# Altium PCB Flight_Computer_2_GE.PcbDoc (part 5 of 5)
Units mil, origin at the board's own origin, x right, y up, seen from the top; angles counter-clockwise.
Board outline 4000 x 3000 mil, 4 copper layers (Top Layer, GND, 3.3V, Bottom Layer), stack 62.449 mil thick; 220 components, 150 nets, 776 pads, 444 vias.
Unrouted connection lines stored in the file: 107.
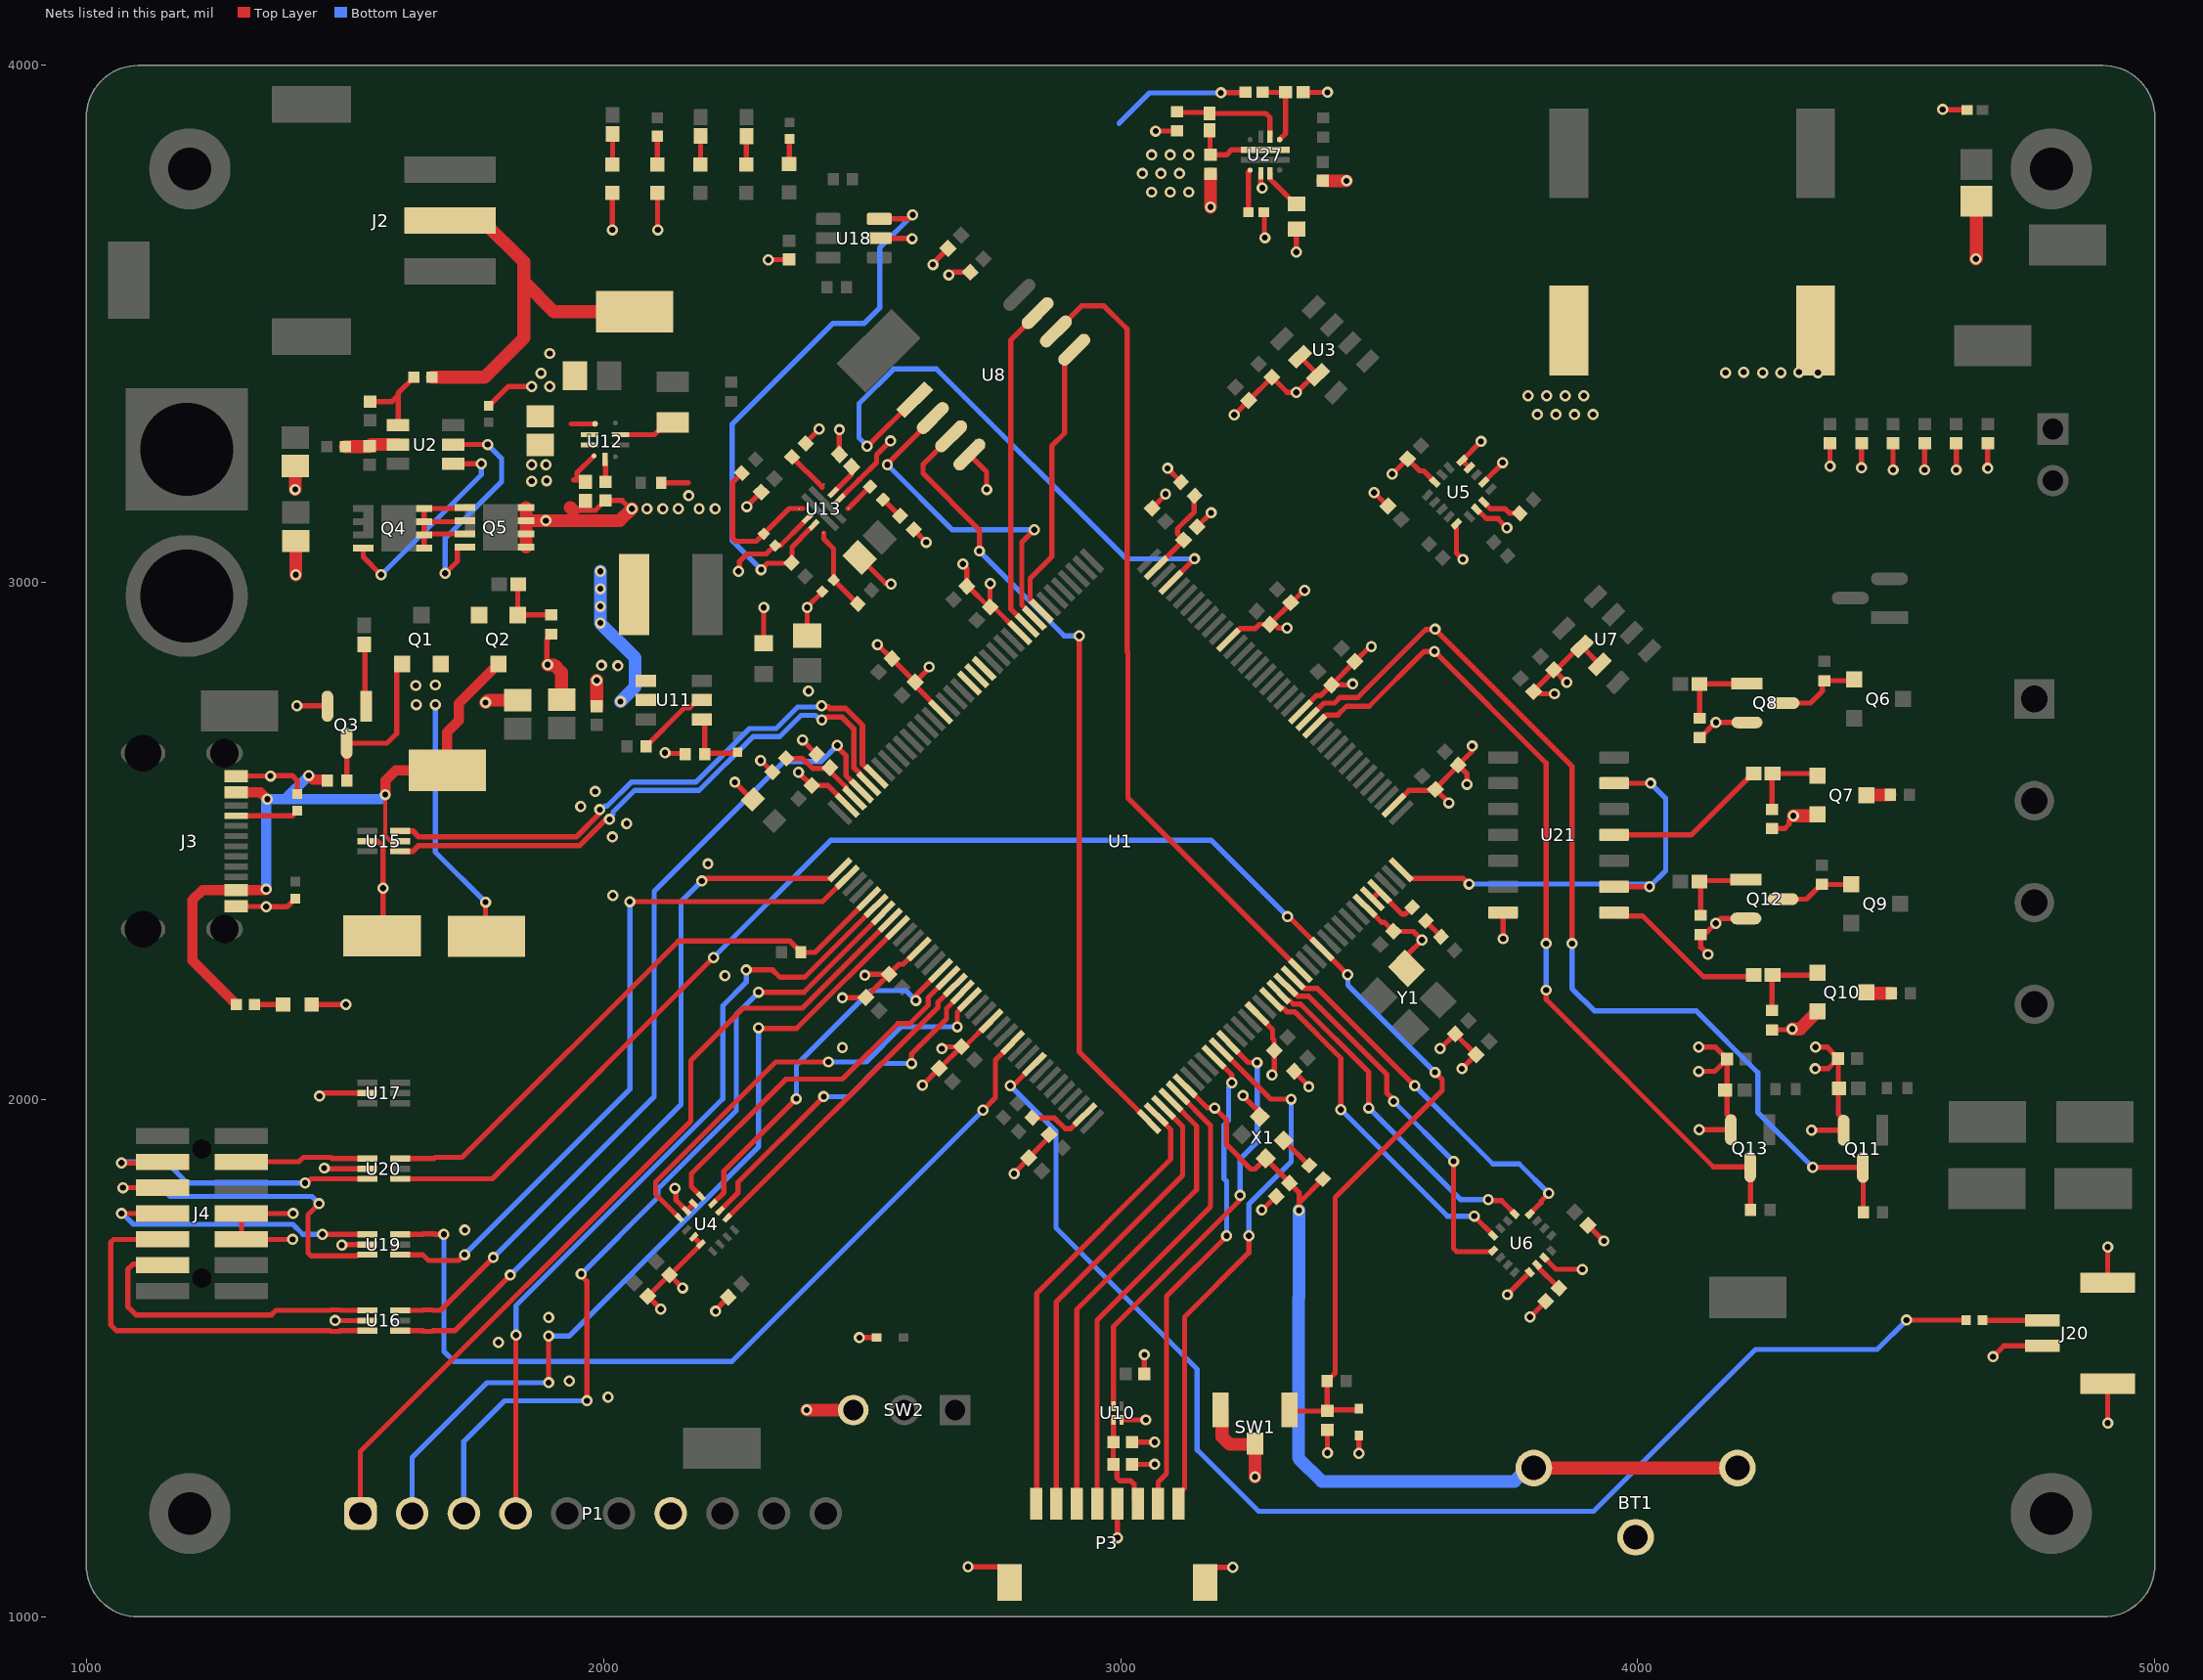
[diagram p5: the nets of this part, all layers, seen from the top]

## Via types
v1: diameter 21.65, hole 11.81, Top Layer to Bottom Layer, 444 vias

## Nets (pads, with @x,y where several pads share a name; then routed paths per layer and width w, separated by ;. In a path a pad name is that pad's centre, name@x,y a point inside that pad or via, vN(x,y) a via of type N, cw(c..) or ccw(c..) an arc to the next point about the centre after c; other vN are vias at no path point) (continued)
GND: BT1.2 C1.1 C2.1 C3.1 C4.1 C5.1 C6.1 C7.1 C8.1 C9.1 C10.1 C11.1 C12.1 C13.1 C14.1 C15.1 C16.2 C17.2 C18.1 C19.1 C20.1 C21.2 C22.1 C23.2 C24.1 C25.1 C26.1 C27.1 C28.1 C31.2 C32.2 C33.1 C34.1 C35.1 C36.1 C37.1 C38.1 C39.2 C40.2 C41.2 C42.2 C43.2 C44.2 C45.2 C46.2 C47.2 C48.2 C49.2 C50.2 C51.2 C52.2 C53.2 C54.2 C55.2 C56.2 C57.2 C58.2 C59.2 C60.2 C61.2 C62.1 C63.1 C64.2 C65.1 C66.1 C67.2 C68.2 C71.2 C101.2 C102.2 C104.2 C105.2 D1.1 D2.1 D3.1 D7.2 D8.2 J3.A1B12 J3.B1A12 J4.5 J4.7 J14.1 J20.1 J20.3 J20.4 P1.7 P3.5 P3.MP1 P3.MP2 Q3.2 Q5.5 Q5.6 Q5.7 Q5.8 Q7.2 Q8.2 Q10.2 Q11.2 Q12.2 Q13.2 R12.2 R13.1 R14.1 R15.2 R16.1 R17.1 R18.1 R23.1 R26.2 R29.2 R30.2 R42.1 R43.1 R46.1 R51.1 R52.1 R54.1 R56.1 R57.1 R68.1 R73.2 R74.2 R75.1 R76.2 SW1.2 SW1.3 SW2.3 U1.16 U1.31 U1.38 U1.51 U1.61 U1.83 U1.94 U1.107 U1.120 U1.130 U3.2 U3.3 U4.2 U4.3 U4.6 U4.7 U5.5 U5.7 U5.10 U5.12 U5.13 U5.16 U6.9 U6.11 U7.2 U7.3 U8.4 U10.4 U11.1 U12.4 U13.2 U13.8 U15.2 U16.2 U17.2 U18.2 U19.2 U20.2 U21.7 U27.8 X1.2 Y1.2 | length 10557.7
  Top Layer w10: J3.B1A12@1289.84,2374.02 1290.35,2373.51 1347.49,2373.51 v1(1348,2373) 1388,2373 1399.4,2384.4 1399.7,2384.4 1404,2388.7 R30.2@1404,2389 ; J3.A1B12@1289.84,2625.98 v1(1356,2626) 1356.72,2626.72 1398.28,2626.72 1408,2617 R29.2@1408,2591.3 ; v1(1399,1730) J4.5@1300,1730 J4.7@1300,1780 v1(1400,1780) ; v1(1407,2762) 1465.2,2762 Q3.2@1466.2,2761 ; D1.1@1435.56,2184.15 1435.63,2184.08 1501.92,2184.08 v1(1502,2184) ; v1(1451,2007) 1454.15,2007 1460.15,2013 U17.2@1543.31,2013 ; v1(1460,1867.83) 1461.14,1866.68 U20.2@1543.31,1866.68 ; v1(1481,1573) U16.2@1543.31,1573 ; v1(1494,1719) 1495,1720 U19.2@1543.31,1720 ; U15.2@1543.31,2500 1544.21,2499.09 1564.06,2499.09 1574,2489.16 v1(1574,2409) 1574,2319 J14.1@1572,2317 ; R26.2@1778,3341.89 1778.14,3341.89 1815.25,3379 v1(1861,3379) ; v1(1892,2841) 1890.47,2842.53 1890.47,2888.61 1892.19,2890.33 1892.19,2894.47 1898.02,2900.3 R23.1@1899,2900.3 ; 1938,3307 U12.4@1983.81,3307 ; 1942,3139.47 1984.19,3139.47 2003.61,3158.89 2035.96,3158.89 2051.85,3143 v1(2055,3143) ; v1(2017,3682) 2017.28,3682.28 2017.28,3753.16 D2.1@2017.56,3753.44 ; D3.1@2104,3753.44 2104.5,3752.94 2104.5,3682.5 v1(2105,3682) ; v1(2111,1595) C3.1@2085.81,1620.19 2086.31,1620.19 2127.31,1661.19 C4.1@2127.81,1661.19 ; v1(2119,2671) 2120.5,2669.5 2153.8,2669.5 2155.3,2671 R15.2@2158.3,2668 ; 2121.53,3193 2164,3193 ; v1(2138,1829) 2140.23,1826.77 2140.23,1805.85 U4.3@2160.66,1785.42 U4.2@2174.58,1799.34 ; v1(2153,1636) C4.1@2127.81,1661.19 ; U4.6@2174.61,1734.61 U4.7@2188.53,1720.69 2188.42,1720.69 2128.92,1661.19 C4.1@2127.81,1661.19 ; v1(2217,1591) 2217,1594 C5.1@2241.39,1618.39 ; v1(2254,2614) 2287.12,2580.88 C41.2@2289.12,2580.88 ; v1(2261,3022) 2263.23,3024.23 2263.23,3041.23 2277.43,3055.43 2314.83,3055.43 2331.26,3071.86 R16.1@2332.14,3071.86 2342.34,3071.86 U13.2@2386.22,3115.75 ; v1(2277,3147) C17.2@2305.19,3175.19 ; v1(2304,2656) 2304.55,2656 R56.1@2326.78,2633.78 ; C23.2@2310,2882.53 v1(2310,2952) ; v1(2319,3624) 2319.44,3624.44 2358.56,3624.44 C31.2@2359,3624.89 ; v1(2377,2633) 2377.31,2633 2402.5,2607.81 C56.2@2402.81,2607.81 ; v1(2385,2696) 2385,2695.5 2412.19,2668.31 C62.1@2412.19,2667.81 ; R18.1@2391.22,3269.22 2391.22,3273.22 2394.22,3273.22 2417,3296 v1(2417,3297) ; C22.1@2394,2897.46 v1(2394,2952) 2394,2953 2422.86,2981.86 R14.1@2422.86,2982.86 ; C56.2@2403.08,2607.53 2434.47,2607.53 2442,2600 2442,2599.94 2471.4,2570.54 U1.107@2471.4,2569.26 ; R17.1@2456.34,3247.66 2455.64,3248.36 2455.64,3294.97 v1(2456.34,3295.66) ; U13.8@2457.36,3161.98 2494.83,3199.45 2495.45,3199.45 2528.17,3232.17 2528.17,3247.17 v1(2555,3274) ; v1(2462,2197) 2462.53,2197.53 2506.92,2197.53 C43.2@2507.19,2197.81 2551.92,2242.53 2507.51,2242.53 v1(2505.49,2240.51) ; v1(2495,1540) D8.2@2528.03,1540 ; C18.1@2495.51,3048.51 2544.8,2999.23 2553.77,2999.23 v1(2556,2997) ; v1(2530,2880) 2530.31,2880 2557.5,2852.81 C46.2@2557.81,2852.81 C57.2@2602.81,2807.81 ; U18.2@2533.41,3666 2533.91,3665.5 2596.5,3665.5 v1(2597,3665) ; C55.2@2552.19,2242.81 2571.43,2262.04 2579.81,2262.04 2609.31,2291.54 U1.120@2610.59,2291.54 ; R68.1@2600.22,3102.78 2600.22,3101.78 2600.72,3101.78 2624,3078.5 v1(2624,3078) ; v1(2617,2028) 2617,2028.11 2649.39,2060.5 C45.2@2649.39,2060.61 2649.69,2060.61 C54.2@2691.61,2102.53 ; v1(2630,2837) 2629.28,2836.28 2629.28,2834.28 C57.2@2602.81,2807.81 ; v1(2637,3615) 2637,3617 C12.1@2666.19,3646.19 ; U1.94@2652.35,2750.22 2652.35,2751.5 2602.81,2801.04 C57.2@2602.81,2807.81 ; v1(2654.23,2098.77) 2657.38,2098.77 2661.13,2102.53 C54.2@2691.61,2102.53 ; v1(2668,3595) 2671.15,3595 2676.63,3600.47 2708.92,3600.47 C11.1@2709.19,3600.19 ; v1(2695,3036) 2695,3034.98 2702.53,3027.45 2702.53,2993.08 C47.2@2702.81,2992.81 2705.31,2992.81 2745.31,2952.81 C58.2@2747.81,2952.81 ; v1(2705,1097) 2705.13,1096.87 2766.72,1096.87 2785.34,1078.25 P3.MP1@2785.34,1066.44 ; U8.4@2707.69,3247.62 2741,3214.31 v1(2741,3180) ; v1(2748,2998) 2747.53,2997.53 2747.53,2953.08 C58.2@2747.81,2952.81 ; U1.130@2749.78,2152.35 2748.5,2152.35 2698.96,2102.81 C54.2@2692.19,2102.81 2691.89,2102.81 C54.2@2691.61,2102.53 ; v1(2794,1857) 2794,1858.02 2822.19,1886.22 C44.2@2822.19,1887.81 2862.19,1927.81 C53.2@2862.19,1932.81 ; U1.83@2805.46,2903.33 2804.18,2903.33 2754.7,2952.81 C58.2@2747.81,2952.81 ; v1(2994,1153) P3.5@2994,1219 ; U10.4@3002,1381 v1(3049,1381) ; C15.1@3022.11,1295 v1(3066,1295) ; C14.1@3022.11,1338 v1(3066,1338) ; C16.2@3046.11,1470 v1(3046.11,1506.89) ; C59.2@3061.19,3143.81 3061.19,3144.5 3087,3170.31 v1(3087,3171) ; v1(3068,3873) 3068.3,3873.3 R74.2@3109,3873.3 ; v1(3091,3221) 3091,3220.5 3116.78,3194.72 R57.1@3116.78,3194.22 ; C63.1@3147.81,3107.81 v1(3175,3135) ; P3.MP2@3163.29,1066.44 3163.29,1077.38 3181.91,1096 v1(3217,1096) ; U1.61@3208.46,2889.41 3209.74,2889.41 3231.33,2911 3260.23,2911 3268.43,2919.19 3278.62,2919.19 3278.9,2918.92 3288.53,2918.92 C51.2@3288.81,2919.19 3297.91,2919.19 3305.25,2911.86 3321.86,2911.86 v1(3322,2912) ; v1(3220,3324.39) C1.1@3247.81,3352.19 C2.1@3292.81,3397.19 3322,3368 v1(3340,3368) 3341.02,3368 3375,3401.98 U3.3@3381.78,3401.98 U3.2@3346.98,3436.78 ; v1(3237,2008) 3237,2006.98 3269.36,1974.62 X1.2@3269.36,1967.29 ; U1.16@3264.14,2166.27 3264.14,2164.99 3294,2135.12 3294,2118.77 3296.92,2115.85 3296.92,2095.47 3297.47,2094.92 3297.47,2055.63 3293,2051.15 v1(3293,2048) ; U27.8@3271.14,3791.72 3271.14,3765.86 v1(3274,3763) ; v1(3273,1787) 3274,1787 3300.19,1813.19 C64.2@3301.19,1813.19 ; C105.2@3276.9,3716 3277.95,3714.95 3277.95,3668.05 v1(3279,3667) ; C51.2@3288.81,2920.19 3328.81,2960.19 C49.2@3328.81,2961.19 3330.5,2961.19 3354.31,2985 v1(3356,2985) ; C68.2@3336.19,2055.19 3336.19,2052.81 3337.39,2052.81 3364,2026.19 v1(3364,2025) ; v1(3340,3639) R73.2@3340,3683.77 ; U1.51@3347.65,2750.22 3379.27,2781.84 3387.45,2781.84 C60.2@3407.81,2802.19 C60.2@3408.08,2802.47 ; R75.1@3352.73,3948 v1(3400,3948) ; v1(3400,1317) C67.2@3400,1361.89 ; v1(3449,2804) 3447,2802 3429.79,2802 3429.31,2802.47 C60.2@3408.08,2802.47 ; v1(3461,1316) D7.2@3461,1351.02 ; U1.31@3472.93,2375.06 3504.99,2343 3510.61,2343 C50.2@3527.81,2325.81 ; v1(3485,2876) 3484.28,2875.28 3480.89,2875.28 C48.2@3452.81,2847.19 C60.2@3408.08,2802.47 ; v1(3490,3174) 3490.5,3174 3516.69,3147.81 C6.1@3517.19,3147.81 ; v1(3525,3210) 3525.5,3210 3554.69,3239.19 C7.1@3555.19,3239.19 ; C50.2@3528.08,2325.53 3566.47,2325.53 v1(3583,2309) 3552.82,2278.82 Y1.2@3552.82,2254.07 ; U1.38@3528.6,2569.26 3557.34,2598 3596.98,2598 3599.17,2600.19 C52.2@3608.81,2600.19 ; C7.1@3555.19,3240.19 C7.1@3555.19,3239.19 ; U5.16@3607.67,3194.49 3586.13,3216.03 3578.36,3216.03 C7.1@3555.19,3239.19 ; v1(3618,2099) 3618.5,2099 3646.69,2127.19 C65.1@3647.19,2127.19 C66.1@3687.19,2087.19 v1(3660,2060) ; v1(3635,2574) C52.2@3608.81,2600.19 ; U5.5@3649.43,3113.75 3645.95,3110.27 3645.95,3108.99 3649.43,3105.51 3649.43,3057.57 v1(3662,3045) ; v1(3670,2610) 3670,2630 C61.2@3652.81,2647.19 ; U5.12@3674.49,3222.33 U5.13@3660.57,3236.25 3660.57,3236.41 3697,3272.84 v1(3697,3273) ; v1(3680,2684) 3679.28,2683.28 3679.28,2673.67 C61.2@3652.81,2647.19 ; U5.7@3688.41,3141.59 3689.69,3141.59 3707.28,3124 3731,3124 3731,3122 v1(3747,3106) ; U5.10@3702.33,3194.49 3702.33,3194.91 3739,3231.58 v1(3739,3232) ; v1(3739.72,2311.28) U21.7@3739.72,2362 ; v1(3748,1623) U6.9@3791.62,1666.63 ; v1(3792,1580) C13.1@3822.19,1610.19 ; U6.11@3819.45,1694.47 3841.92,1672 v1(3893,1672) ; C9.1@3837.61,2831.39 3837.33,2831.11 C9.1@3837.33,2829.42 ; v1(3839,2785) 3813.19,2785 3808.72,2789.47 3799.08,2789.47 C8.1@3798.81,2789.19 3798.81,2790.89 C9.1@3837.33,2829.42 ; C9.1@3839.31,2831.39 3842.1,2831.39 3887.49,2876.78 U7.2@3891.98,2876.78 U7.3@3926.78,2841.98 ; v1(3863,2807) 3862.5,2807 3840.08,2829.42 C9.1@3837.33,2829.42 ; C10.1@3903.81,1757.19 3934,1727 v1(3935,1727) ; v1(4118,2055) 4149.17,2055 C40.2@4172.78,2078.61 ; v1(4118,2102) 4149.78,2102 4165.57,2086.2 4165.97,2086.2 4172.78,2079.39 C40.2@4172.78,2079 C40.2@4172.78,2078.61 ; v1(4119,1942) Q13.2@4180.2,1942 4180.2,1964.08 4172.78,1971.5 4172.78,2019 C40.2@4172.78,2078.61 ; R42.1@4120,2700.3 4120.98,2700.3 4149.56,2728.88 4150.68,2728.88 v1(4151.4,2729.6) Q8.2@4211.33,2729.6 ; v1(4136,2281) 4122,2295 R52.1@4122,2319.3 4127.83,2325.13 4135.13,2325.13 v1(4151,2341) 4160.5,2350.5 Q12.2@4209.33,2350.5 ; R51.1@4260,2135.3 4296.28,2135.3 4297.98,2137 v1(4299,2137) ; R43.1@4260,2524.3 4284.3,2524.3 4293,2533 4293,2539.98 4301,2547.98 v1(4301,2549) ; v1(4336,1941) Q11.2@4398.2,1941 4398.2,1961.56 4387.89,1971.86 C39.2@4387.89,2079.61 ; v1(4343.38,2060) 4343.57,2060.19 4368.47,2060.19 C39.2@4387.89,2079.61 ; v1(4344,2102) 4365.89,2102 4380.69,2087.2 4381.08,2087.2 4387.89,2080.39 C39.2@4387.89,2080 C39.2@4387.89,2079.61 ; v1(4372,3225) C36.1@4372,3269.89 ; v1(4433,3222) C37.1@4433,3269.89 ; v1(4494,3218) C38.1@4494,3269.89 ; v1(4555,3218) C34.1@4555,3269.89 ; v1(4590,3915) 4590.5,3914.5 4636.69,3914.5 R76.2@4637.19,3914 ; v1(4616,3218) C35.1@4616,3269.89 ; v1(4677,3221) C33.1@4677,3269.89 ; v1(4687,1503) 4708,1524 J20.1@4783,1524 ; v1(4908.98,1374.98) J20.3@4908.98,1451.17 ; J20.4@4908.98,1646.05 v1(4908.98,1714.98) ; C52.2@3608.81,2600.19 3608.81,2601.69 3652.81,2645.69 C61.2@3652.81,2647.19
  Top Layer w25: v1(1404,3180) C27.1@1404,3225.44 ; v1(1405,3015) C28.1@1405,3080.44 ; v1(1772,2768) 1776.56,2772.56 C19.1@1834,2772.56 ; Q5.5@1850.41,3068.61 Q5.6@1850.41,3094.2 Q5.7@1850.41,3119.8 ; Q5.8@1850.41,3145.39 Q5.7@1850.41,3119.8 ; v1(1888.61,3119.8) v1@1889.57,3119.8 ; v1(1892,2841) 1904.36,2841 1919,2826.36 C20.1@1919,2773.56 ; 1936.09,3145.39 1942,3139.47 ; C21.2@1987,2761.11 v1(1987,2811) ; v1(2055,3143) 2031.8,3119.8 v1@1889.57,3119.8 ; v1(2393,1400) SW2.3@2483.15,1400 ; v1(3174,3726) C71.2@3174,3790.89 ; SW1.2@3193.07,1400 3196.32,1396.75 3196.32,1348.33 3210.96,1333.68 3258.64,1333.68 SW1.3@3260,1335.04 v1(3260,1271) ; C104.2@3391,3776.89 v1(3436.89,3776.89) v1@3437,3777 ; v1(4299,2137) 4314.16,2137 Q10.2@4347.76,2170.6 ; v1(4301,2549) 4345.16,2549 Q7.2@4347.76,2551.6 ; v1(4654,3626) 4655,3627 C32.2@4655,3737.57 ; Q5.7@1850.41,3119.8 v1@1889.57,3119.8
  other v1: 2009,1425 1934,1456 1797,1531 1894,1579 1732,1748 2462,2101 2235,2240 2018,2395 2202,2456 2017,2508 2045,2534 1956,2567 1984,2596 2396.68,2790 2028,2839 1996,2840 2084,3143 2115,3143 2145,3143 2185,3143 2216,3143 2165,3168 3806,3325 3842,3325 3878,3325 3914,3325 3788,3361 3824,3361 3860,3361 3896,3361 1896,3379 1879,3405 4169.89,3405.89 4241.89,3405.89 4276.89,3405.89 4348.89,3405.89 4204.89,3406.89 4311.89,3406.89 1896,3443
GND_CNT: Q4.5 Q4.6 Q4.7 Q4.8 Q5.1 Q5.2 Q5.3 | length 316.1
  Top Layer w10: Q4.5@1653.41,3066.61 Q4.6@1653.41,3092.2 ; Q5.3@1732.3,3094.2 1664.46,3094.2 1662.46,3092.2 Q4.6@1653.41,3092.2 ; Q5.2@1732.3,3119.8 1723.76,3119.8 1722.07,3118.1 1722.07,3117.8 Q4.7@1653.41,3117.8 ; Q5.1@1732.3,3145.39 1730.3,3143.39 Q4.8@1653.41,3143.39 Q4.7@1653.41,3117.8 ; Q4.6@1653.41,3092.2 Q4.7@1653.41,3117.8
GND_Detect: J4.11 U20.1 | length 247.8
  Top Layer w10: J4.11@1300,1880 1411,1880 1419.65,1888.65 1473.09,1888.65 1475.38,1886.37 U20.1@1543.31,1886.37
GND_Detect_p: R1.2 U1.113 U20.6 | length 1133.3
  Top Layer w10: U20.6@1606.69,1886.37 1672.78,1886.37 1675.06,1888.65 1726.65,1888.65 2144.81,2306.81 2360.87,2306.81 2381.7,2285.98 R1.2@2381.7,2285 2409.18,2285 U1.113@2513.15,2388.98
GPS_CTRL.GPS_INT: P3.4 U1.5 | length 911.1
  Top Layer w10: P3.4@2954.63,1219 2954.63,1573.63 3174,1793 3174,1950.18 U1.5@3111.02,2013.15
GPS_CTRL.NRST: P3.2 U1.3 | length 882.7
  Top Layer w10: P3.2@2875.89,1219 2875.89,1609.89 3120,1854 3120,1948.5 U1.3@3083.18,1985.32
GPS_CTRL.NSAFE: P3.3 U1.4 | length 896.9
  Top Layer w10: P3.3@2915.26,1219 2915.26,1594.26 3147,1826 3147,1949.34 U1.4@3097.1,1999.23
GPS_CTRL.PPS: P3.1 U1.2 | length 871.8
  Top Layer w10: P3.1@2836.52,1219 2838,1220.48 2838,1626 3097,1885 3097,1942.38 3069.26,1970.12 U1.2@3069.26,1971.4
GPS_CTRL.SWITCH: U1.12 U10.2 | length 851
  Top Layer w10: U10.2@2986.25,1407.57 2986.25,1561.25 3230.28,1805.28 3230.28,1814.28 v1(3231,1815) ; U1.12@3208.46,2110.59 3247.05,2072 v1(3264,2072)
  Bottom Layer w10: v1(3231,1815) 3231,1885 3264,1918 v1(3264,2072)
GPS_I2C.SCL: P3.8 U1.11 | length 1047.3
  Top Layer w10: P3.8@3112.11,1219 3112.11,1237.7 3124,1249.59 3124,1580 3248,1704 v1(3248,1737) ; U1.11@3194.54,2096.67 3290.21,2001 v1(3330,2001)
  Bottom Layer w10: v1(3248,1737) 3248,1798 3330,1880 v1(3330,2001)
GPS_I2C.SDA: P3.7 U1.10 | length 941.1
  Top Layer w10: P3.7@3072.74,1219 3072.74,1260.74 3089,1277 3089,1620 3205,1736 v1(3205,1737) ; U1.10@3180.62,2082.75 3215,2048.37 v1(3215,2033)
  Bottom Layer w10: v1(3205,1737) 3205,1842.01 3200,1847.01 3200,1951 3209,1960 3209,2023.85 3215,2029.85 v1(3215,2033)
IMU_CS: U1.125 U4.12 | length 633.1
  Top Layer w10: U4.12@2239.31,1771.47 2647,2179.16 2647,2188.76 U1.125@2680.19,2221.95
IMU_INT: U1.127 U4.4 | length 858.9
  Top Layer w10: U4.4@2146.74,1771.5 2101.03,1817.21 2101.03,1841.03 2333,2073 v1(2435,2073) ; v1(2684.2,2141) 2684.2,2169 2708.03,2192.83 U1.127@2708.03,2194.11
  Bottom Layer w10: v1(2435,2073) 2508,2073 2576,2141 v1(2684.2,2141)
IMU_MISO: U1.124 U4.1 | length 713.2
  Top Layer w10: U4.1@2188.5,1813.26 2170,1831.76 2170,1857 2353,2040 2462,2040 2569.25,2147.25 2592.25,2147.25 2628,2183 2628,2197.6 U1.124@2666.27,2235.86
IMU_MOSI: U1.123 U4.14 | length 710.9
  Top Layer w10: U4.14@2211.47,1799.31 2233,1820.84 2233,1862 v1(2373,2002) ; v1(2604,2192) 2604,2201.44 U1.123@2652.35,2249.78
  Bottom Layer w10: v1(2373,2002) 2373,2067 2517,2211 2585,2211 v1(2604,2192)
IMU_SCLK: U1.126 U4.13 | length 678.9
  Top Layer w10: U4.13@2225.39,1785.39 2260,1820 2260,1840 v1(2426,2006) ; v1(2596,2070) 2596,2089 2663.38,2156.38 2663.38,2176.48 2694.11,2207.21 U1.126@2694.11,2208.03
  Bottom Layer w10: v1(2426,2006) 2474,2006 2538,2070 v1(2596,2070)
JTAG.JTCK: U1.109 U16.4 | length 1450.6
  Top Layer w10: U16.4@1606.69,1553.32 1650.23,1553.32 1651.37,1552.17 1668.63,1552.17 1669.77,1553.32 1712.32,1553.32 v1(1820,1661) ; v1(2190,2423) 2193.15,2423 2198.45,2428.3 2441.12,2428.3 U1.109@2457.48,2444.66
  Bottom Layer w10: v1(1820,1661) 2150,1991 2150,2383 v1(2190,2423)
JTAG.JTDI: U1.110 U19.4 | length 1389.3
  Top Layer w10: U19.4@1606.69,1700.32 1650.36,1700.32 1661.68,1689 1719.63,1689 1730.95,1700.32 v1(1731.32,1700.32) ; v1(2051,2383) 2423.66,2383 U1.110@2471.4,2430.74
  Bottom Layer w10: v1(1731.32,1700.32) 2051,2020 v1(2051,2383)
JTAG.JTDO: U1.133 U19.6 | length 1718
  Top Layer w10: U19.6@1606.69,1739.68 1650.64,1739.68 1651.64,1740.69 1673.6,1740.69 1674.6,1739.68 v1(1691.32,1739.68) ; v1(2734,1980) 2758,2004 2758,2077.05 U1.133@2791.54,2110.59
  Bottom Layer w10: v1(1691.32,1739.68) 1691.32,1513.68 1711,1494 2248,1494 v1(2734,1980)
JTAG.JTMS: U1.105 U16.6 | length 1638.7
  Top Layer w10: U16.6@1606.69,1592.68 1650.23,1592.68 1651.37,1593.83 1668.63,1593.83 1669.77,1592.68 1684.68,1592.68 v1(1787,1695) ; v1(2452,2685) 2452,2682.48 2469,2665.48 2469,2627.34 U1.105@2499.23,2597.1
  Bottom Layer w10: v1(1787,1695) 2098,2006 2098,2403 2348.83,2653.83 2420.83,2653.83 v1(2452,2685)
JTCK_X: J4.6 U16.3 | length 764
  Top Layer w10: J4.6@1147.24,1730 1052.86,1730 1047,1724.14 1047,1564.86 1058.54,1553.32 1471.23,1553.32 1472.37,1552.17 1489.63,1552.17 1490.77,1553.32 U16.3@1543.31,1553.32
JTDI_X: J4.10 U19.3 | length 689.8
  Top Layer w10: v1(1071,1830) J4.10@1147.24,1830 ; v1(1450,1799) 1428.68,1777.68 1428.68,1704.03 1434.54,1698.17 1522.96,1698.17 1524.2,1699.41 1542.4,1699.41 U19.3@1543.31,1700.32
  Bottom Layer w10: v1(1071,1830) 1145,1830 1162,1813 1436,1813 v1(1450,1799)
JTDO_X: J4.8 U19.1 | length 571.4
  Top Layer w10: v1(1068,1780) J4.8@1147.24,1780 ; v1(1456.32,1739.68) 1485.23,1739.68 1485.37,1739.83 1502.63,1739.83 1502.77,1739.68 U19.1@1543.31,1739.68
  Bottom Layer w10: v1(1068,1780) 1069.94,1780 1090.77,1759.17 1399.28,1759.17 1418.77,1739.68 v1(1456.32,1739.68)
JTMS_X: J4.4 U16.1 | length 618.7
  Top Layer w10: J4.4@1147.24,1680 1145.24,1682 1090,1682 1080,1672 1080,1600 1096,1584 1358,1584 1366.68,1592.68 1471.23,1592.68 1472.37,1593.83 1489.63,1593.83 1490.77,1592.68 U16.1@1543.31,1592.68
LED_DRIVE1: U1.88
LED_DRIVE2: U1.89
LED_DRIVE3: U1.90
LoRa_CTRL.M0: P1.1 U1.116 | length 1638.9
  Top Layer w10: P1.1@1530,1200 1530,1320 2169,1959 2169,2076 2270,2177 2384.69,2177 U1.116@2554.91,2347.22
LoRa_CTRL.M1: P1.2 U1.117 | length 1659.5
  Top Layer w10: v1(1894,1453) v1(1894,1543) ; v1(2300,2139) 2301,2138 2373.53,2138 U1.117@2568.83,2333.3
  Bottom Layer w10: P1.2@1630,1200 1630,1308 1775,1453 v1(1894,1453) ; v1(1894,1543) 1933.45,1543 2300,1909.55 v1(2300,2139)
LoRa_CTRL.RX: P1.4 U1.114 | length 1549.8
  Top Layer w10: P1.4@1830,1200 1830.5,1200.5 1830.5,1544.5 v1(1831,1545) ; v1(2276,2251) 2327.08,2251 2341.08,2237 2389.01,2237 U1.114@2527.07,2375.06
  Bottom Layer w10: v1(1831,1545) 1831,1602 2230.89,2001.89 2230.89,2181.89 2276,2227 v1(2276,2251)
LoRa_CTRL.TX: P1.3 U1.115 | length 1650.8
  Top Layer w10: v1(1957,1663) 1957,1659.85 1968,1648.85 v1(1968,1418) ; v1(2300,2208) 2387.85,2208 U1.115@2540.99,2361.14
  Bottom Layer w10: P1.3@1730,1200 1730,1339 1809,1418 v1(1968,1418) ; v1(1957,1663) 2105.61,1811.61 2105.61,1827.61 2257,1979 2257,2165 v1(2300,2208)
MAGNET_CS: U1.18 U6.4 | length 676.4
  Top Layer w10: U1.18@3291.97,2194.11 3308.33,2177.75 3313.67,2177.75 3321.35,2170.08 3336.38,2170.08 3426,2080.45 v1(3426,1981) ; v1(3684,1775) 3684,1774.62 3720.63,1737.99 U6.4@3720.63,1737.62
  Bottom Layer w10: v1(3426,1981) 3632,1775 v1(3684,1775)
MAGNET_MISO: U1.20 U6.5 | length 736.9
  Top Layer w10: U1.20@3319.81,2221.95 3321.09,2221.95 3342.96,2200.08 3363.92,2200.08 3514.58,2049.42 3514.58,2013.57 3528,2000.15 v1(3528,1997) ; v1(3644,1881) 3644,1712.38 3650.12,1706.26 3718.51,1706.26 U6.5@3720.63,1708.38
  Bottom Layer w10: v1(3528,1997) v1(3644,1881)
MAGNET_MOSI: U1.21 U6.16 | length 721.6
  Top Layer w10: U1.21@3333.73,2235.86 3335.01,2235.86 3355.8,2215.08 3380.92,2215.08 v1(3569,2027) ; U6.16@3791.62,1779.37 3813.61,1801.37 3813.61,1804.61 v1(3828,1819)
  Bottom Layer w10: v1(3569,2027) 3720,1876 3771,1876 v1(3828,1819)
MAGNET_SCLK: U1.19 U6.1 | length 674.5
  Top Layer w10: U1.19@3305.89,2208.03 3322.25,2191.67 3327.59,2191.67 3334.19,2185.08 3347.92,2185.08 3480,2053 v1(3480,1984) ; v1(3711,1807) 3713.07,1804.93 3736.83,1804.93 U6.1@3762.38,1779.37
  Bottom Layer w10: v1(3480,1984) 3657,1807 v1(3711,1807)
MODE: R13.2 U12.7 | length 78.3
  Top Layer w10: 1942,3198.53 R13.2@1965,3198.53 ; 1948.81,3203.37 1948.81,3211.97 U12.7@1981.84,3245
NetC13_2: C13.2 U6.10 | length 62.2
  Top Layer w10: U6.10@3805.53,1680.55 3807.66,1678.42 3807.66,1675.96 C13.2@3847.81,1635.81
NetC29_2: C29.2 R20.1 U2.5 | length 103.8
  Top Layer w25: R20.1@1500.72,3263 1547,3263 C29.2@1548,3264 1551,3267 U2.5@1602.9,3267
NetC30_2: C30.2 R25.1 U2.4 | length 168.7
  Top Layer w10: C30.2@1549,3350.11 1591.11,3350.11 1602.9,3361.9 1602.9,3366.62 ; U2.4@1602.9,3304.4 1602.9,3366.62 ; R25.1@1633.28,3397 1602.9,3366.62
NetC105_1: C105.1 U27.7 | length 83
  Top Layer w10: C105.1@3247.1,3716 3247.1,3794.25 U27.7@3250.47,3797.63
NetD1_2: D1.2 R31.1 | length 55
  Top Layer w10: R31.1@1325.43,2184.15 D1.2@1380.44,2184.15
NetD2_2: D2.2 R33.1 | length 59.3
  Top Layer w10: D2.2@2017.56,3808.56 2017.78,3808.78 2017.78,3867.45 R33.1@2018,3867.67
NetD3_2: D3.2 R32.1 | length 54.7
  Top Layer w10: D3.2@2104,3808.56 R32.1@2104,3863.28
NetD4_2: D4.2 R34.1 | length 55.3
  Top Layer w10: D4.2@2187.56,3808.56 2187.78,3808.78 2187.78,3863.45 R34.1@2188,3863.67
NetD5_2: D5.2 R35.1 | length 55.2
  Top Layer w10: D5.2@2276,3808.56 2276.5,3809.06 2276.5,3862.84 R35.1@2277,3863.34
NetD9_2: D9.2 R70.1 | length 49
  Top Layer w10: D9.2@2359,3809.56 2359.5,3810.06 2359.5,3857.61 R70.1@2360,3858.11
NetJ3_A5: J3.A5 R29.1 | length 122.3
  Top Layer w10: J3.A5@1289.84,2549.21 1398.81,2549.21 1408,2558.4 R29.1@1408,2558.7
NetJ20_2: J20.2 R5.1 | length 116.4
  Top Layer w10: R5.1@4666.89,1574 4667.28,1573.61 4782.61,1573.61 J20.2@4783,1573.21
NetL1_1: L1.1 U11.2 | length 291.4
  Bottom Layer w25: v1(1994,3022) v1(1994,2922) 2061,2855 2061,2798 v1(2033,2770)
  other v1: 1994,2954 1994,2988
NetQ1_1: Q1.1 Q3.3 R24.2 | length 315.7
  Top Layer w10: R24.2@1503.7,2617 1503.65,2617.05 Q3.3@1503.6,2689.33 Q3.3@1503.6,2689.33 1581.33,2689.33 1600,2708 1600,2832.16 Q1.1@1610.6,2842.76
NetQ2_1: Q2.1 R21.2 R23.2 | length 124.8
  Top Layer w10: R21.2@1835,2997 1834.4,2996.4 Q2.1@1834.4,2937.24 1834.86,2937.7 R23.2@1899,2937.7
NetQ3_1: Q3.1 R22.2 | length 121.3
  Top Layer w10: R22.2@1537,2880.67 1539,2878.67 1539,2763 Q3.1@1541,2761
NetQ6_1: Q6.1 Q8.3 R38.2 | length 164.2
  Top Layer w10: Q8.3@4283,2767 4334,2767 4357.33,2790.33 4357.33,2806.63 R38.2@4361,2810.3 4416.43,2810.3 Q6.1@4418.76,2812.62
NetQ7_1: Q7.1 R40.2 R43.2 | length 158.4
  Top Layer w10: R43.2@4260,2561.7 4260,2630 R40.2@4261,2631 4343.16,2631 Q7.1@4347.76,2626.4
NetQ7_3: Q7.3 R39.1 | length 46.5
  Top Layer w25: Q7.3@4442.24,2589 4487.3,2589 R39.1@4488.3,2590
NetQ8_1: Q8.1 R41.2 R42.2 | length 158.7
  Top Layer w10: R42.2@4120,2737.7 4120,2803.33 R41.2@4119.33,2804 4119.53,2804.2 4211.13,2804.2 Q8.1@4211.33,2804.4
NetQ9_1: Q9.1 Q12.3 R47.2 | length 143.6
  Top Layer w10: Q12.3@4281,2387.91 4326.62,2387.91 4355.02,2416.3 R47.2@4356,2416.3 4412.65,2416.3 Q9.1@4412.76,2416.4
NetQ10_1: Q10.1 R49.2 R51.2 | length 157.3
  Top Layer w10: R51.2@4260,2172.7 4260,2240 R49.2@4261,2241 4343.35,2241 Q10.1@4347.76,2245.4
NetQ10_3: Q10.3 R45.1 | length 48.9
  Top Layer w25: Q10.3@4442.24,2208 4444.24,2206 R45.1@4490.3,2206
NetQ11_3: Q11.3 R48.1 U1.50 | length 1961.7
  Top Layer w10: U1.50@3361.57,2736.3 3362.77,2736.3 3393.31,2766.84 3413.62,2766.84 3424.79,2778 3459,2778 3590.28,2909.28 3607.28,2909.28 v1(3608,2910) 3873,2645 v1(3873,2302) ; v1(4338.67,1869.33) Q11.3@4435.6,1869.33 4435.95,1868.98 4435.95,1782.35 R48.1@4436.3,1782
  Bottom Layer w10: v1(3873,2302) 3873,2215 3916,2172 4113,2172 4232.22,2052.78 4232.22,1975.78 v1(4338.67,1869.33)
NetQ12_1: Q12.1 R50.2 R52.2 | length 157.8
  Top Layer w10: R52.2@4122,2356.7 4122,2419.33 R50.2@4119.33,2422 4120.98,2423.65 4207.68,2423.65 Q12.1@4209.33,2425.31
NetQ13_3: Q13.3 R55.1 U1.49 | length 1666.5
  Top Layer w10: U1.49@3375.49,2722.38 3376.77,2722.38 3398.39,2744 3420,2744 3436.87,2760.87 3480.87,2760.87 3587,2867 v1(3607,2867) 3823,2651 v1(3823,2302) ; v1(3823,2212) 3823,2193.7 4146.37,1870.33 Q13.3@4217.6,1870.33 4218.1,1869.83 4218.1,1787.5 R55.1@4218.6,1787
  Bottom Layer w10: v1(3823,2212) v1(3823,2302)
NetR2_1: R2.1 U5.8 | length 78.5
  Top Layer w10: U5.8@3702.33,3155.51 3702.5,3155.51 3715.02,3143 3743,3143 3751.53,3134.47 3771.08,3134.47 R2.1@3771.78,3133.78
NetR7_2: R7.2 U13.3 U18.3 | length 1099.8
  Top Layer w10: v1(2305,3025) 2317.53,3037.53 2363.08,3037.53 R7.2@2363.78,3038.22 ; R7.2@2364.47,3038.92 2364.47,3068.94 U13.3@2398.75,3103.22 ; U18.3@2533.41,3703.4 2589.38,3703.4 2596.98,3711 v1(2598,3711)
  Bottom Layer w10: v1(2305,3025) 2249,3081 2249,3306.65 2443.35,3501 2504,3501 2534.14,3531.14 2534.14,3647.14 v1(2598,3711)
NetR8_2: R8.2 R14.2 U13.4 | length 164.3
  Top Layer w10: U13.4@2426.04,3095.73 2426.04,3084.44 2445.14,3065.34 R14.2@2445.14,3005.14 2445.28,3005.14 2491.64,2958.78 R8.2@2491.78,2958.78
NetR9_1: R9.1 R15.1 U11.4 | length 135
  Top Layer w9.95: U11.4@2190.13,2735.6 2195.7,2730.03 R15.1@2195.7,2668 2197.83,2670.13 2256.87,2670.13 R9.1@2259,2672.25
NetR10_2: R10.2 R16.2 U13.1 | length 297.1
  Top Layer w10: R10.2@2267.78,3211.78 2250,3194 2250,3085.86 2255.86,3080 2295.73,3080 R16.2@2309.86,3094.14 2358.97,3143.24 2385.22,3143.24
NetR11_1: R11.1 U11.5 | length 145.3
  Top Layer w10: R11.1@2082.7,2683 2082.7,2683.98 2156.13,2757.41 2166.67,2757.41 2182.26,2773 U11.5@2190.13,2773
NetR17_2: R17.2 U13.9 | length 72.7
  Top Layer w10: U13.9@2439.25,3168.78 2480,3209.53 2480,3212.98 2480.7,3213.67 2480.7,3223.3 R17.2@2480,3224
NetR18_2: R18.2 U13.10 | length 82.2
  Top Layer w10: R18.2@2364.78,3242.78 2422.93,3184.63
NetR40_1: R40.1 U21.11 | length 319.4
  Top Layer w10: U21.11@3954.28,2512 4103.21,2512 4222.21,2631 R40.1@4224.34,2631
NetR49_1: R49.1 U21.8 | length 322.7
  Top Layer w10: U21.8@3954.28,2362 3961.09,2355.19 4009.81,2355.19 4127,2238 4221.34,2238 R49.1@4224.34,2241
NetR67_1: R67.1 U13.7 | length 59.8
  Top Layer w10: U13.7@2473.16,3143.22 R67.1@2515.47,3185.53
NetR67_2: R67.2 R68.2 | length 46.2
  Top Layer w10: R67.2@2540.53,3160.47 2541.53,3160.47 2572.78,3129.22 R68.2@2573.78,3129.22
NetR73_1: R73.1 U27.9 | length 82.3
  Top Layer w10: U27.9@3288.86,3791.72 3288.94,3791.65 3288.94,3780.46 3303.39,3766 3303.73,3766 3337.5,3732.23 R73.1@3340,3732.23
nRST: C67.1 D7.1 R61.2 SW1.1 U1.25 U20.4 | length 3360.7
  Top Layer w10: U20.4@1606.69,1847 1785,1847 v1(2213,2275) ; v1(3323,2354) 3325.67,2354 3388.13,2291.54 U1.25@3389.41,2291.54 ; SW1.1@3326.93,1400 3328.82,1398.11 C67.1@3400,1398.11 ; U1.25@3389.41,2291.54 v1(3439,2242) ; D7.1@3461,1402.98 3458.56,1400.55 3401.74,1400.55 3399.65,1398.46 3399.65,1455.65 R61.2@3399.3,1456 3399.3,1456.98 3405.13,1462.81 3406.11,1462.81 3415,1471.7 3415,1811 3622,2018 3622,2039 v1(3608,2053)
  Bottom Layer w10: v1(2213,2275) 2440,2502 3175,2502 v1(3323,2354) ; v1(3439,2242) 3439.72,2241.28 3439.72,2221.28 v1(3608,2053)
NRST_JTAG: J4.12 U20.3 | length 576.5
  Top Layer w10: v1(1068,1878) 1145.24,1878 J4.12@1147.24,1880 ; v1(1423,1839) 1426.15,1839 1434.15,1847 U20.3@1543.31,1847
  Bottom Layer w10: v1(1068,1878) 1070,1880 1154,1880 1195,1839 v1(1423,1839)
OC: Q5.4 U2.2 | length 446.2
  Top Layer w10: v1(1694,3018) 1717.61,3041.61 1717.61,3066.92 1719.31,3068.61 Q5.4@1732.3,3068.61 ; U2.2@1709.2,3267 v1(1776,3267)
  Bottom Layer w10: v1(1694,3018) 1694,3086 1803,3195 1803,3240 v1(1776,3267)
OD: Q4.4 U2.1 | length 416.3
  Top Layer w10: Q4.4@1535.3,3066.61 1535.3,3049.7 v1(1570,3015) ; U2.1@1709.2,3229.6 1709.4,3229.8 1763.8,3229.8 v1(1764,3230)
  Bottom Layer w10: v1(1570,3015) 1764,3209 v1(1764,3230)
OE_X: R59.2 X1.1 | length 69.4
  Top Layer w10: X1.1@3315.29,1921.36 3315.97,1921.36 3364.1,1873.22 R59.2@3364.78,1873.22
OV_SET: R69.2 R74.1 U27.2 | length 221.2
  Top Layer w10: R74.1@3109,3910.7 3110.67,3909.03 3170.33,3909.03 R69.2@3172,3907.36 3280.64,3907.36 3288.86,3899.14 U27.2@3288.86,3862.59
PDR_ON_X: R58.1 U1.143 | length 121.7
  Top Layer w10: R58.1@2829.22,1965.22 2829.92,1964.53 2872.47,1964.53 2893,1944 2903.34,1944 U1.143@2930.74,1971.4
"PYRO ARM": U1.36 U21.9 U21.13 | length 858.3
  Top Layer w10: U1.36@3542.52,2444.66 3558.88,2428.3 3661.68,2428.3 3672.98,2417 v1(3674,2417) ; U21.9@3954.28,2412 v1(4023,2412) ; U21.13@3954.28,2612 v1(4025,2612)
  Bottom Layer w10: v1(3674,2417) 4016.98,2417 4021.98,2412 v1(4023,2412) 4054,2443 4054,2583 v1(4025,2612)
RUNCAM_TX_X: R5.2 U1.136 | length 2606.8
  Top Layer w10: v1(2787,2027) 2791.47,2027 U1.136@2833.3,2068.83 ; v1(4520,1574) R5.2@4635.11,1574
  Bottom Layer w10: v1(2787,2027) 2875,1939 2875,1752 3148,1479 3148,1323 3267,1204 3914.68,1204 4227.68,1517 4463,1517 v1(4520,1574)
SD_CS: U1.69 U8.1 | length 1110.8
  Top Layer w10: v1(2510,3264) 2510.97,3264 2600.66,3353.69 U8.1@2601.62,3353.69 ; U1.69@3097.1,3000.77 3097.43,3000.77 3142.67,3046 v1(3143,3046)
  Bottom Layer w10: v1(2510,3264) 2494,3280 2494,3346 2561,3413 2644,3413 3011,3046 v1(3143,3046)
SD_IO0: U1.80 U8.5 | length 549.6
  Top Layer w10: U1.80@2847.22,2945.09 2847.22,2946.37 2825.18,2968.41 2825.18,3008.18 2867,3050 2867,3264 2891.73,3288.73 2891.73,3431.66 U8.5@2910.38,3450.31
SD_IO1: U1.81 U8.2 | length 653.8
  Top Layer w10: v1(2549,3228) 2549,3229.18 2636.98,3317.16 U8.2@2636.98,3318.33 ; v1(2833,3102) 2809,3078 2809,2956.75 2833.3,2932.45 U1.81@2833.3,2931.17
  Bottom Layer w10: v1(2549,3228) 2675,3102 v1(2833,3102)
SD_IO2: U1.1 U8.3 | length 1546.1
  Top Layer w10: U8.3@2672.33,3282.98 2618,3228.64 2618,3211 2727,3102 v1(2727,3061) ; v1(2920,2897) 2920,2092.82 U1.1@3055.34,1957.48
  Bottom Layer w10: v1(2727,3061) 2891,2897 v1(2920,2897)
SD_IO3: U1.82 U8.7 | length 638.2
  Top Layer w10: U1.82@2819.38,2917.25 2788,2948.63 2788,3469.36 U8.7@2839.67,3521.02
SD_SCLK: U1.22 U8.6 | length 1556
  Top Layer w10: U8.6@2875.02,3485.67 2924.36,3535 2968,3535 3007,3496 3007.14,3496 3013,3490.14 3013,2867 3014,2866 3014,2583.44 U1.22@3347.65,2249.78
SS: C26.2 U12.8 | length 43.9
  Top Layer w10: U12.8@2003,3238.6 2003,3230.88 2004,3229.88 C26.2@2004,3195.11
SW: L2.1 U12.2 | length 110.8
  Top Layer w9.84: U12.2@2033.02,3285.84 2098.4,3285.84 L2.1@2122.19,3309.63
  Top Layer w25: L2.1@2122.19,3309.63 L2.1@2134,3309.63
USB_D_N: U1.103 U15.6 | length 1134.9
  Top Layer w10.58: U15.6@1606.69,2519.68 1631.47,2519.68 1642.87,2508.29 1947.29,2508.29 1992.94,2553.94 v1(1992.94,2561.06) ; v1(2422,2761.65) 2424.12,2759.54 2434.84,2759.54 2437.86,2756.51 2468.49,2756.51 2500.87,2724.13 2500.87,2648.95 2508.52,2641.3 2510.72,2641.3 U1.103@2527.07,2624.94
  Bottom Layer w9.95: v1(1992.94,2561.06) 1996.11,2561.06 2003.01,2567.97 2007.41,2567.97 2053.6,2614.15 2178.6,2614.15 2282.39,2717.95 2333.95,2717.95 2375.41,2759.41 2419.76,2759.41 v1(2422,2761.65)
USB_D_P: U1.104 U15.4 | length 1124.8
  Top Layer w10.58: U15.4@1606.69,2480.32 1631.47,2480.32 1642.87,2491.71 1954.16,2491.71 2004.67,2542.21 v1(2011.79,2542.21) ; v1(2422.36,2734.25) 2425.36,2734.25 2431.03,2739.93 2461.62,2739.93 2484.29,2717.26 2484.29,2642.08 2496.8,2629.57 2496.8,2627.38 U1.104@2513.15,2611.02
  Bottom Layer w9.95: v1(2011.79,2542.21) 2011.79,2545.38 2018.69,2552.29 2018.69,2556.69 2060.21,2598.2 2185.2,2598.2 2289,2702 2340.56,2702 2382.02,2743.46 2409.98,2743.46 2419.19,2734.25 v1(2422.36,2734.25)
UV_SET: R71.1 R75.2 U27.1 | length 141.7
  Top Layer w10: R71.1@3275.72,3948 R71.1@3274.73,3948 R75.2@3319.27,3948 3319.27,3868.56 3307.56,3856.86 U27.1@3307.56,3856.69
UVBUS: J3.A4B9 J3.B4A9 J15.1 Q2.3 R24.1 R31.2 U15.5 | length 1481.9
  Top Layer w8: v1(1578,2590) 1578,2510.26 1586.35,2501.91 1604.79,2501.91 U15.5@1606.69,2500
  Top Layer w19.68: J3.A4B9@1289.84,2594.49 1336.51,2594.49 v1(1350,2581) ; R31.2@1290,2184.15 1205,2269.15 1205,2386 1224.51,2405.51 J3.B4A9@1289.84,2405.51 1346.51,2405.51 v1(1348,2407) ; v1(1430,2627) 1438.03,2618.97 1465.31,2618.97 1466.3,2617.98 R24.1@1466.3,2617 ; v1(1578,2590) 1578.38,2590.38 1578.38,2617.38 1598,2637 J15.1@1698,2637 1698,2711 1720.38,2733.38 1720.38,2766.13 Q2.3@1797,2842.76
  Bottom Layer w19.68: v1(1348,2407) 1348,2579 v1(1350,2581) 1384,2581 ; v1(1430,2627) 1384,2581 ; v1(1578,2590) 1569,2581 1384,2581
VBAT: BT1.1 C64.1 R59.1 U1.6 X1.4 | length 1808.9
  Top Layer w10: U1.6@3124.94,2027.07 3167.29,1984.72 3181.28,1984.72 v1(3182,1984) 3204.91,1961.09 3204.91,1913.09 3251.82,1866.18 3260.11,1866.18 X1.4@3280.64,1886.71 3280.64,1885.84 3326.81,1839.68 C64.1@3326.81,1838.81 3345.72,1819.89 3345.72,1801.28 ; v1(3345,1786) 3345.72,1786.72 3345.72,1801.28 ; R59.1@3391.22,1846.78 3345.72,1801.28
  Top Layer w25: BT1.1@3799.15,1287.93 BT1.1@4192.85,1287.93
  Bottom Layer w25: v1(3345,1786) 3345,1617.5 3344,1616.5 3344,1307 3389,1262 3761.57,1262 3787.5,1287.93 BT1.1@3799.15,1287.93
VC: J2.2 J12.1 R25.2 | length 769.9
  Top Layer w25: R25.2@1668.72,3397 1770,3397 1846,3473 1846,3582 ; J2.2@1703.07,3700 1766.06,3700 1846,3620.06 1846,3582 ; J12.1@2060,3524 1904,3524 1846,3582
VCAP1: C63.2 R57.2 U1.71 | length 179.9
  Top Layer w10: U1.71@3069.26,3028.6 3069.26,3028.93 3122.19,3081.86 3122.19,3082.81 3110,3095 3110,3104.15 3142.53,3136.68 3142.53,3167.08 R57.2@3143.22,3167.78
VCAP2: C62.2 R56.2 U1.106 | length 171.9
  Top Layer w10: R56.2@2353.22,2660.22 2353.92,2659.53 2385.47,2659.53 2404.18,2640.82 2426.8,2640.82 2427.9,2641.92 2437.53,2641.92 C62.2@2437.81,2642.19 2437.81,2636.04 2468.96,2604.88 2468.96,2599.54 U1.106@2485.32,2583.18
VCC: C25.2 C71.1 J10.1 Q1.2 Q2.2 R69.1 R71.2 U12.5 U12.6 U27.5 | length 916.6
  Top Layer w10: v1(1772,2382) 1772,2318 J10.1@1774,2316 ; R69.1@3172,3874.64 3173,3873.64 3173,3828.11 C71.1@3174,3827.11 3204.99,3827.11 3214.88,3837 U27.5@3280,3837 ; v1(3194,3947) 3194.5,3947.5 3240.77,3947.5 R71.2@3241.27,3948
  Bottom Layer w10: v1(1675,2764) 1675,2479 v1(1772,2382) ; 2997,3888 3056,3947 v1(3194,3947)
  other v1: 1638,2764 1637,2801 1675,2802 1861,3196 1890,3197 1861,3228 1889,3228 3060,3755 3096,3755 3132,3755 3042,3791 3078,3791 3114,3791 3060,3827 3096,3827 3132,3827
VOUT: C14.2 C15.2 P3.6 U10.3 | length 194.4
  Top Layer w10: U10.3@2986.25,1381 2986.07,1380.82 2986.07,1338.18 C14.2@2985.89,1338 C15.2@2985.89,1295 2992.7,1288.19 2992.7,1268.86 2998.56,1263 3020,1263 3026.56,1256.44 3026.56,1225.81 P3.6@3033.37,1219
VREF+: R60.1 U1.32 U1.33 | length 106.5
  Top Layer w10: U1.32@3486.85,2388.98 U1.33@3500.77,2402.9 3544.8,2358.87 3550.42,2358.87 R60.1@3563.78,2372.22
VREF+_X: FB1.2 R60.2 | length 42.8
  Top Layer w10: R60.2@3590.22,2345.78 3590.22,2345.28 3619.78,2315.72 FB1.2@3619.78,2315.22
pads on no net: J2.1 J2.3 J2.4 J2.5 J3.A8 J3.B8 J4. J4.1 J4.2 J4.9 P1.8 P1.9 P1.10 Q4. Q5. U1.7 U1.9 U1.13 U1.14 U1.15 U1.24 U1.26 U1.27 U1.28 U1.29 U1.34 U1.44 U1.45 U1.48 U1.53 U1.56 U1.57 U1.58 U1.59 U1.60 U1.63 U1.68 U1.70 U1.73 U1.74 U1.75 U1.76 U1.77 U1.78 U1.79 U1.85 U1.86 U1.87 U1.91 U1.92 U1.93 U1.96 U1.97 U1.98 U1.99 U1.100 U1.101 U1.102 U1.119 U1.122 U1.128 U1.129 U1.132 U1.134 U1.135 U1.137 U1.139 U1.140 U1.141 U1.142 U4.9 U4.10 U4.11 U5.2 U5.3 U5.9 U5.11 U6.3 U6.6 U6.7 U6.8 U6.12 U6.14 U6.15 U21.1 U21.2 U21.3 U21.4 U21.5 U21.6 U27.3 U27.10

## Polygon pours and split planes (outlines as drawn)
VCC on Top Layer "VCC_IN_TOP" (solid, remove dead copper, pour order 33): 1993,3290 1992,3291 1844,3291 1844,3177 1851,3170 1920,3170 1920,3252 1928,3260 1988,3260 1990,3262 1990,3291
GND on Top Layer "TOP_GND_8V-5V-2" (solid, remove dead copper, pour order 28): 1918,3168 1921,3171 2103,3171 2107,3175 2107,3217 2229,3217 2231,3215 2231,3088 1918,3088
BATT on Top Layer "BATT_TOP_IN" (solid, remove dead copper, pour order 23): 1047,3106 1051,3110 1450,3110 1450,2950 1457,2957 1667,2957 1667,3425 1047,3425
3V3 on Top Layer "3V3_IN" (solid, remove dead copper, pour order 49): 2492,3092 2615,2969 2622,2969 2674,3021 2644,3051 2620,3051 2535,3136 2493,3094 2493,3092
GND on Top Layer "VCC_MOS_VIA" (solid, remove dead copper, pour order 48): 4150,3575 4448,3575 4449,3576 4456,3569 4456,3375.97 4141.85,3375.97 4150,3384.11 4150,3574
GND on Top Layer "CAP_GND" (solid, remove dead copper, pour order 46): 3934,3590 3934,3300 3932,3302 3767,3302 3767,3590
5V on Top Layer "VCC_MOS_VIA" (solid, remove dead copper, pour order 45): 1745,2740 1749.4,2735.6 2046.06,2735.6 2046.06,2706.94 2058,2695 2058,2638 1806,2638 1800,2644 1800,2696 1747,2696 1745,2698
AV_HOLD on Top Layer "AV_HOLD_PYRO_PU_TOP" (solid, pour order 41): 3972,3744 4111,3744 4122,3733 4122,3060 3977,3060 3969,3068 3971,3070 3971,3745
BATT_ARM on Top Layer "BATT_ARM_MECH1" (solid, remove dead copper, pour order 38): 4143,3258.57 4143,3362 4838,3362 4838,3247 4836,3245 4831,3258.57
AV_HOLD on Top Layer "VCC_MOS_VIA" (solid, remove dead copper, pour order 37): 3345,3830 3623,3830 3723,3930 4553,3930 4561,3922 4561,3664 3555,3664 3496,3723 3496,3797 3345,3797
VCC on Top Layer "VCC_EFUSE" (solid, remove dead copper, pour order 36): 3030,3847 3027,3844 3027,3733 3147,3733 3149,3731 3150,3732 3150,3809 3211,3809 3220,3818 3220,3825 3225,3830 3259,3830 3259,3841 3260,3842 3255,3847
3V3_PRE on Top Layer "3V3_PRE_EFUSE_ENTER" (solid, remove dead copper, pour order 14): 2343.33,3320.33 2343.33,3213.33 2379.83,3176.83 2386.87,3166.77 2386.87,3151.33 2363.87,3174.33 2332.33,3174.33 2249.33,3257.33 2249.33,3320.33
5V on Top Layer "TOP_5V_Out" (solid, remove dead copper, pour order 31): 1987,3363 1990,3366 1990,3468 2209,3468 2210,3467 2211,3468 2273,3468 2273,3372 2274,3371 2271,3368 2184,3368 2184,3354 2183,3353 2080,3353 2080,3308 2073,3301 2071.43,3302.57 2015.8,3302.57 2015.8,3361.8 2016,3362 1988,3362
GND on Top Layer "TOP_GND_8V-5V" (solid, remove dead copper, pour order 27): 1818,3305 1945,3305 1945,3353 1944,3354 1949,3359 1977,3359 1977,3474 1966,3463 1874,3463 1874,3432 1875,3431 1870,3426 1837,3426 1837,3359 1819,3359 1819,3306
VCC on Top Layer "VCC_MOS_VIA" (solid, remove dead copper, pour order 26): 1667.92,2859.11 1668.03,2859 1701,2859 1701,2748 1695,2742 1619,2742 1619,2818 1626,2825 1661.03,2825 1661.03,2852.22
VCC on Top Layer "VCC_MOS_OUT" (solid, remove dead copper, pour order 22): 1661.03,2825 1688.1,2959 1778,2959 1781,2956 1780,2955 1780,2881 1724,2825
3V3_PRE on Top Layer "3V3_SW_OUT" (solid, pour order 19): 2171.12,2790.95 2463.95,2790.95 2499,2826 2499,2927 2496,2927 2479,2944 2476,2941 2434,2941 2434,2863 2435,2862 2430.7,2857.7 2170.63,2857.7 2170.63,2791.44
NetL1_1 on Top Layer "3V3SwitchingInd" (solid, pour order 17): 1984,3054 2088,3054 2088,2897 2087,2896 2085,2898 1984,2898 1984,3034 1984,3047
NetL1_1 on Top Layer "3V3Switching" (solid, pour order 16): 2013,2753 2110,2753 2110,2790 2015,2790 2015,2755
GND on Top Layer "3V3_SW_GND" (solid, remove dead copper, pour order 15): 1730,2749 1999,2749 1999,2777 2015,2793 2108,2793 2108,2827 2105,2830 2108,2833 2108,2857 1884,2857 1867,2840 1867,2805 1782,2805 1756,2779 1730,2779
VCC on Bottom Layer "VCC_MOS_VIA" (solid, remove dead copper, pour order 34): 1817.98,3190 1817.98,3905 3008,3905 3065,3848 3213,3848 3213,3806 3212,3805 3139,3805 3139,3748 3125,3734 1965,3734 1965,3500 1918,3453 1918,3190
3V3_PRE on Bottom Layer "3V3_PRE_EFUSE" (solid, remove dead copper, pour order 32): 2475,2794 2473,2792 2249,2792 2249,3315 2521,3315 2521,2846 2480,2805
5V on Bottom Layer "5V_TO_3V3" (solid, remove dead copper, pour order 44): 2270.53,3467.77 2270.29,3468 1989,3468 1989,3226 1915,3152 1915,2796 1786,2796 1744,2754 1744,2641 2012,2641 2013,2642 1969,2686 1969,3141
AV_HOLD on Bottom Layer "BOT_PYRO_AV_HOLD" (solid, remove dead copper, pour order 42): 3974,3174 4113,3174 4115,3176 4122,3169 4122,3033 4234,3033 4292,2975 4292,2460 4211,2460 4210,2459 4193,2476 4193,2895 4146,2895 3974,3067
BATT_ARM on Bottom Layer "PYRO_BATT_ARM_BOT" (solid, remove dead copper, pour order 40): 4144,3362 4333,3362 4340,3355 4340,3166 4459,3166 4474,3151 4471,3148 4471,2262 4336,2262 4329,2269 4336,2276 4336,3075 4157,3075 4142,3090 4144,3092
AV_HOLD on Bottom Layer "AV_HOLD_BOT" (solid, remove dead copper, pour order 39): 3500,3827 3502,3825 4486,3825 4486,3414 4483,3411 4486,3408 4915,3408 4915,3165 4845,3095 4711,3095 4711,3364 4415,3364 4415,3673 4391,3697 3504,3697 3504,3825 3500,3829
VCC on Bottom Layer "VCC_MOS_CNT" (solid, remove dead copper, pour order 24): 1629,2745 1706,2745 1904,2943 1904,3296 1847,3296 1772,3221 1772,2888
VCC on Bottom Layer "VCC_MOS_CNT2" (solid, remove dead copper, pour order 25): 1619,2744 1619,2817 1700,2817 1700.5,2816.5 1629,2745 1620,2745
GND on 3.3V (split plane): 2445.9,2719.11 2393.4,2666.6 2247.89,2521.1 2127,2521.1 2125.05,2520.71 2123.4,2519.6 2055.89,2452.1 1929.1,2452.1 1929.1,2574.89 2139.11,2784.9 2445.9,2784.9
3V3 on 3.3V (split plane): 4907.84,3979.61 4915.61,3978.46 4923.22,3976.55 4930.61,3973.91 4937.71,3970.55 4944.44,3966.51 4950.75,3961.84 4956.57,3956.57 4961.84,3950.75 4966.51,3944.44 4970.55,3937.71 4973.91,3930.61 4976.55,3923.22 4978.46,3915.61 4979.61,3907.84 4979.97,3900.63 4979.9,3900 4979.9,1100 4979.97,1099.37 4979.61,1092.16 4978.46,1084.39 4976.55,1076.78 4973.91,1069.39 4970.55,1062.29 4966.51,1055.56 4961.84,1049.25 4956.57,1043.43 4950.75,1038.16 4944.44,1033.49 4937.71,1029.45 4930.61,1026.09 4923.22,1023.45 4915.61,1021.54 4907.84,1020.39 4900.63,1020.03 4900,1020.1 1100,1020.1 1099.37,1020.03 1092.16,1020.39 1084.39,1021.54 1076.78,1023.45 1069.39,1026.09 1062.29,1029.45 1055.56,1033.49 1049.25,1038.16 1043.43,1043.43 1038.16,1049.25 1033.49,1055.56 1029.45,1062.29 1026.09,1069.39 1023.45,1076.78 1021.54,1084.39 1020.39,1092.16 1020.03,1099.37 1020.1,1100 1020.1,3900 1020.03,3900.63 1020.39,3907.84 1021.54,3915.61 1023.45,3923.22 1026.09,3930.61 1029.45,3937.71 1033.49,3944.44 1038.16,3950.75 1043.43,3956.57 1049.25,3961.84 1055.56,3966.51 1062.29,3970.55 1069.39,3973.91 1076.78,3976.55 1084.39,3978.46 1092.16,3979.61 1099.37,3979.97 1100,3979.9 4900,3979.9 4900.63,3979.97
GND on GND (split plane): 4907.84,3979.61 4915.61,3978.46 4923.22,3976.55 4930.61,3973.91 4937.71,3970.55 4944.44,3966.51 4950.75,3961.84 4956.57,3956.57 4961.84,3950.75 4966.51,3944.44 4970.55,3937.71 4973.91,3930.61 4976.55,3923.22 4978.46,3915.61 4979.61,3907.84 4979.97,3900.63 4979.9,3900 4979.9,1100 4979.97,1099.37 4979.61,1092.16 4978.46,1084.39 4976.55,1076.78 4973.91,1069.39 4970.55,1062.29 4966.51,1055.56 4961.84,1049.25 4956.57,1043.43 4950.75,1038.16 4944.44,1033.49 4937.71,1029.45 4930.61,1026.09 4923.22,1023.45 4915.61,1021.54 4907.84,1020.39 4900.63,1020.03 4900,1020.1 1100,1020.1 1099.37,1020.03 1092.16,1020.39 1084.39,1021.54 1076.78,1023.45 1069.39,1026.09 1062.29,1029.45 1055.56,1033.49 1049.25,1038.16 1043.43,1043.43 1038.16,1049.25 1033.49,1055.56 1029.45,1062.29 1026.09,1069.39 1023.45,1076.78 1021.54,1084.39 1020.39,1092.16 1020.03,1099.37 1020.1,1100 1020.1,3900 1020.03,3900.63 1020.39,3907.84 1021.54,3915.61 1023.45,3923.22 1026.09,3930.61 1029.45,3937.71 1033.49,3944.44 1038.16,3950.75 1043.43,3956.57 1049.25,3961.84 1055.56,3966.51 1062.29,3970.55 1069.39,3973.91 1076.78,3976.55 1084.39,3978.46 1092.16,3979.61 1099.37,3979.97 1100,3979.9 4900,3979.9 4900.63,3979.97

## Keep-outs
Keep-Out Layer:
  circle w10: c3779,1717 r326.27

## Other copper
3.3V (plane layer: these items are gaps in the copper):
  lines w10: 1924,2447 2058,2447 2127,2516 2250,2516 2397,2663 2451,2717 2451,2789 2450,2790 2137,2790 1924,2577 1924,2447

## Silkscreen, mask and mechanical layers (free items; w line width, h text height)
Top Overlay:
  drawing of 22 lines, arcs and shapes, not listed
  text "EFUSE_PG" at 2321.15,3684.82 h10
  text "3V3_PG" at 2248.15,3647.82 h10
  text "5V_PG" at 2165.15,3646.82 h10
  text "3.3V" at 2000.15,3644.15 h10
  text "5V" at 2096.15,3644.15 h10
  text "BATT" at 1145,3570.1 h30
  text "CGND" at 4746,3559 h60
  text "P3V3" at 2580.58,3540.08 h30
  text "VC" at 2164,3493.1 h30
  text "B_ARM" at 4785,3447.99 h60
  text "." at 3502,3139 h60
  text "BGND" at 1071,2743 h30
  text "UVBUS" at 1694,2552 h30
  text "GND" at 1509,2229 h30
  text "VCC" at 1700.25,2227.25 h30
  text "D1" at 1389,2221 h20
  text "UVBUS" at 1384,2128 h10
  text "R31" at 1275,2121 h20
  text "." at 3676,1806 h60
  text "EM2H" at 4799,1710 h30
  text "EM1H" at 4596,1709 h30
  text "EM2L" at 4799,1686 h30
  text "EM1L" at 4596,1684 h30
  text "3V3" at 4165,1527 h60
  text "5V" at 2204.25,1380.25 h30
  text "Designed by: / George, Andrew, / Deen, Aditya" at 1058,1283 h41